# Altium PCB PCB1.PcbDoc (part 3 of 5)
Units mm, origin at the board's own origin, x right, y up, seen from the top; angles counter-clockwise.
Board outline 130 x 90 mm, 4 copper layers (Top Layer, Int 1 (GND), Int 2 (PWR), Bottom Layer), stack 1.466 mm thick; 419 components, 281 nets, 1355 pads, 522 vias.
Unrouted connection lines stored in the file: 26.
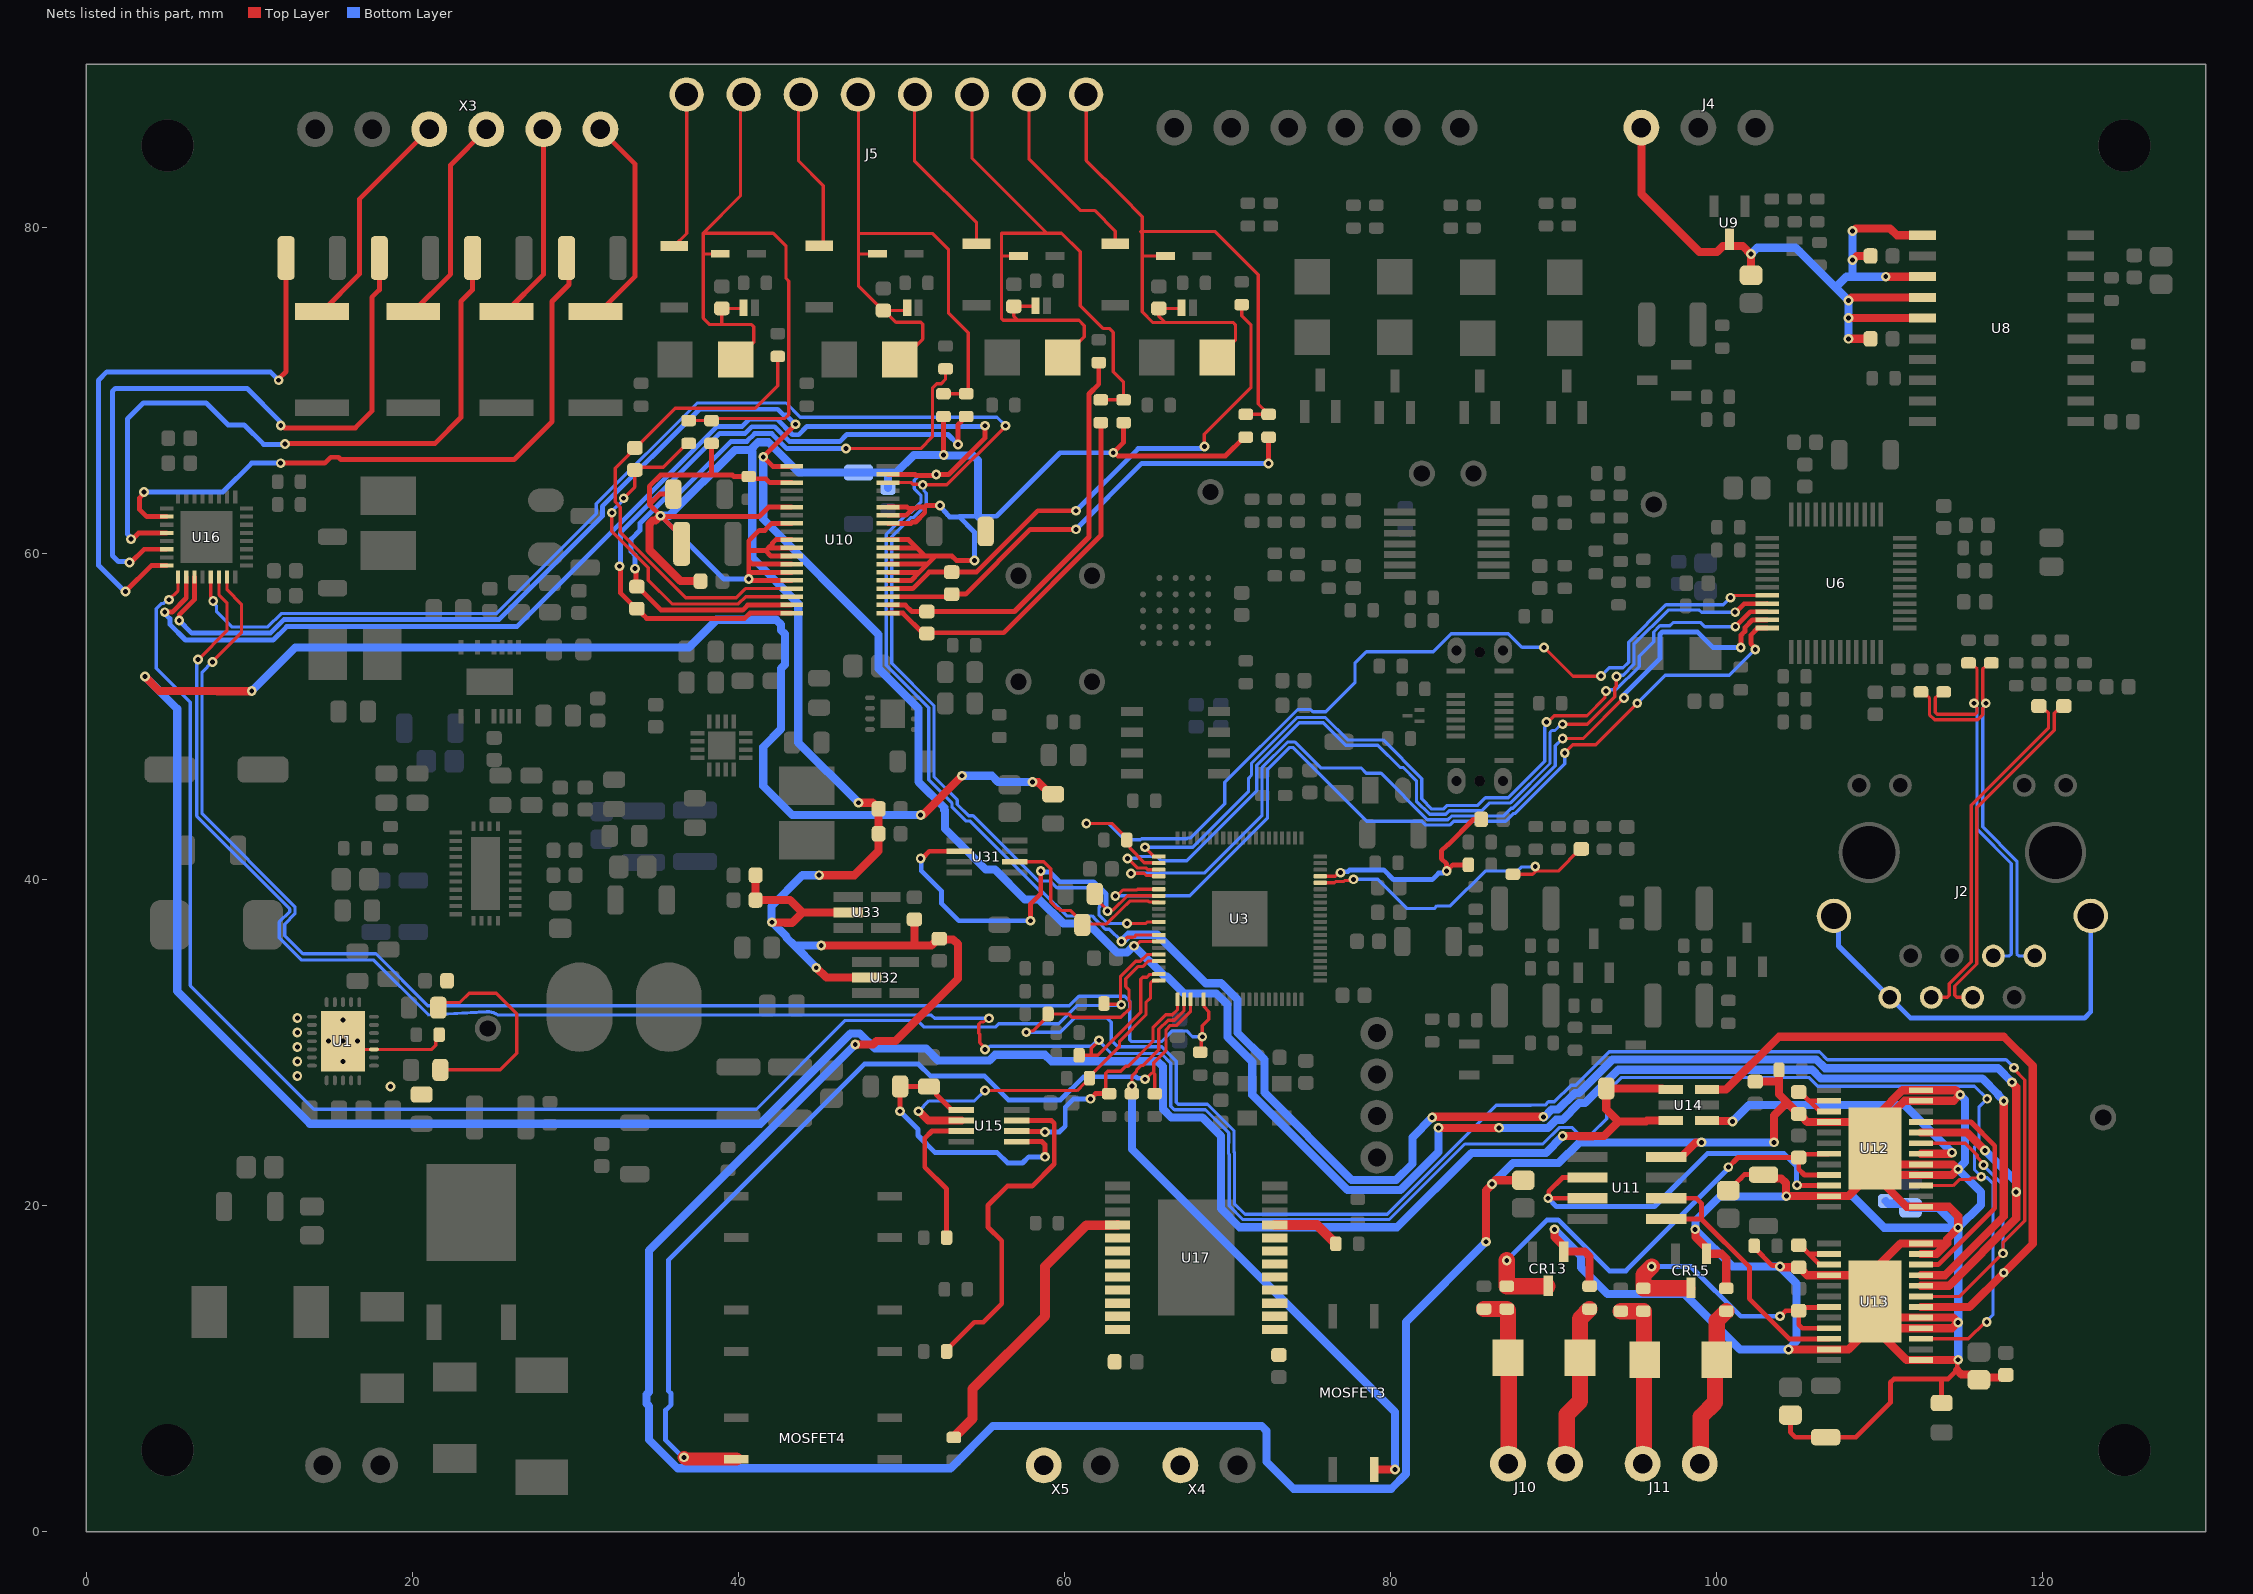
[diagram p5: the nets of this part, all layers, seen from the top]

## Via types
v1: diameter 0.6, hole 0.3, Top Layer to Bottom Layer, tented both sides, 508 vias
v2: diameter 0.6, hole 0.3, Top Layer to Bottom Layer, 14 vias

## Nets (pads, with @x,y where several pads share a name; then routed paths per layer and width w, separated by ;. In a path a pad name is that pad's centre, name@x,y a point inside that pad or via, vN(x,y) a via of type N, cw(c..) or ccw(c..) an arc to the next point about the centre after c; other vN are vias at no path point) (continued)
AGND: C60.1 C61.1 C62.1 C63.2 C64.1 C65.1 C66.1 C67.1 C76.1 C77.1 C78.1 C79.1 C80.2 C81.2 C83.2 C84.2 C86.1 C87.1 C88.1 C89.2 C123.1 C124.1 C125.2 C126.2 CR13.1 CR15.1 R62.1 R80.1 R81.1 R82.1 R83.1 R85.1 R87.2 R88.2 R89.1 R179.2 U10.3 U10.6 U10.8 U10.10 U10.11 U10.12 U10.13 U10.14 U10.15 U10.24 U10.25 U10.26 U10.27 U10.28 U10.29 U10.31 U10.32 U10.33 U11.4 U12.1 U12.4 U12.5 U12.11 U12.12 U12.16 U12.23 U12.25 U13.1 U13.4 U13.5 U13.11 U13.12 U13.16 U13.23 U13.25 U32.2 U33.2 | length 518.9
  Top Layer w0.3: C61.1@36.017,63.627 35.179,63.627 34.544,62.992 ; C63.2@36.488,61.048 v1@35.306,62.23 ; R80.1@38.354,66.737 38.354,64.929 38.227,64.802 ; U10.15@43.278,58.333 40.808,58.333 40.721,58.42 v1(40.64,58.42) 40.64,58.928 ; U10.14@43.278,58.833 40.735,58.833 40.64,58.928 ; U10.13@43.278,59.333 40.851,59.333 40.64,59.544 ; U10.12@43.278,59.833 41.996,59.833 41.669,60.16 ; U10.11@43.278,60.333 41.931,60.333 41.887,60.377 ; U10.10@43.278,60.833 42.291,60.833 42.104,60.646 42.104,60.595 41.887,60.377 ; U10.8@43.278,61.833 42.055,61.833 41.63,61.408 41.291,61.408 40.64,60.757 40.64,60.16 ; U10.6@43.278,62.833 41.852,62.833 41.277,62.258 35.334,62.258 v1@35.306,62.23 ; U10.3@43.278,64.333 41.927,64.333 41.69,64.57 40.778,64.57 R62.1@40.64,64.708 39.728,64.708 39.634,64.802 38.227,64.802 ; U10.24@49.178,58.333 50.592,58.333 51.093,58.833 ; U10.25@49.178,58.833 51.093,58.833 ; U10.26@49.178,59.333 51.592,59.333 ; U10.27@49.178,59.833 51.435,59.833 ; U10.28@49.178,60.333 50.935,60.333 ; U10.29@49.178,60.833 50.435,60.833 50.935,60.333 ; U10.31@49.178,61.833 50.606,61.833 50.689,61.916 50.867,61.916 51.435,62.484 51.435,62.833 ; U10.32@49.178,62.333 50.3,62.333 50.725,62.758 ; U10.33@49.178,62.833 50.36,62.833 50.435,62.758 50.725,62.758 ; v1(52.373,62.934) 51.536,62.934 51.435,62.833 ; R81.1@52.578,68.388 52.578,66.04 52.591,66.027 v1(52.591,66.023) ; v1(54.483,59.563) 53.366,59.563 53.096,59.833 52.061,59.833 ; R82.1@63.627,68.007 63.627,66.802 v1(62.992,66.167) 63.073,66.167 63.267,65.973 69.875,65.973 71.02,67.118 R83.1@71.12,67.118 ; C81.2@100.711,20.916 100.73,20.916 101.478,21.664 101.478,21.683 101.69,21.895 C84.2@102.87,21.895 ; R88.2@102.297,17.526 102.297,17.426 103.41,16.313 103.829,16.313 v1(103.886,16.256) ; C80.2@104.521,7.151 104.521,6.096 104.826,5.791 C83.2@106.68,5.791 108.534,5.791 110.65,7.907 110.65,9.145 110.855,9.35 113.792,9.35 ; R179.2@113.792,7.885 113.792,9.35 ; v1(114.808,10.541) 114.801,10.534 114.751,10.484 114.751,9.897 114.632,9.779 114.602,9.779 114.173,9.35 113.792,9.35 ; 34.544,62.992 v1(35.234,62.302) v1@35.306,62.23 ; 34.544,62.992 34.544,64.113 35.233,64.802 38.227,64.802 ; 40.64,58.928 40.64,59.544 ; 40.64,59.544 40.64,60.16 ; 40.64,60.16 41.669,60.16 ; 41.669,60.16 41.887,60.377 ; 50.725,62.758 50.911,62.758 50.986,62.833 51.435,62.833 ; 50.935,60.333 51.435,59.833 ; 51.093,58.833 51.592,59.333 ; 51.435,59.833 52.061,59.833 ; 51.592,59.333 52.077,59.817 52.061,59.833
  Top Layer w0.5: v1(35.234,62.302) 35.207,62.302 34.911,62.006 34.752,62.006 34.544,61.798 34.544,60.198 36.449,58.293 C62.1@37.679,58.293 ; C123.1@41.061,40.259 C124.1@41.061,38.735 43.162,38.735 43.924,37.973 ; v1(42.065,37.374) 42.084,37.355 42.858,37.355 42.875,37.338 43.289,37.338 43.924,37.973 ; v1(44.776,34.579) 44.803,34.579 45.408,33.975 U32.2@47.864,33.975 ; v1(44.958,40.259) 47.117,40.259 48.601,41.743 C64.1@48.601,42.799 C67.1@48.601,44.323 48.601,44.373 48.426,44.548 48.376,44.548 48.22,44.704 v1(47.371,44.704) ; v1(45.085,35.941) 50.8,35.941 ; U33.2@46.729,37.973 43.924,37.973 ; v1(47.167,29.876) 48.254,29.876 48.467,30.089 49.647,30.089 53.467,33.909 53.467,36.029 53.174,36.322 C125.2@52.364,36.322 ; C126.2@50.8,37.552 50.8,35.941 ; C125.2@52.324,36.362 52.274,36.362 51.853,35.941 50.8,35.941 ; v1(85.852,17.78) 85.852,20.928 86.213,21.289 v1(86.213,21.316) 86.448,21.551 C89.2@88.138,21.551 ; v1(90.043,18.542) 90.055,18.53 90.055,18.075 90.581,17.55 90.581,17.204 CR13.1@90.614,17.17 91.909,17.17 92.202,16.877 R85.1@92.202,15.051 ; U11.4@96.902,22.987 97.825,22.987 98.714,23.876 v1(99.06,23.876) ; v1(98.679,18.542) 98.698,18.523 98.698,18.068 99.377,17.389 CR15.1@99.377,17.043 100.291,17.043 100.584,16.75 R89.1@100.584,14.924 ; C88.1@102.362,27.599 103.794,27.599 103.821,27.572 ; C84.2@102.87,21.895 103.099,21.666 103.955,21.666 104.248,21.373 104.248,20.593 v1(104.267,20.574) U12.23@106.883,20.574 108.077,20.574 U12.25@109.093,21.59 ; v1(103.505,23.876) 103.505,25.514 104.258,26.267 104.376,26.267 ; R87.2@103.821,28.321 103.821,27.572 ; v1(103.886,16.256) 103.913,16.256 103.953,16.216 C87.1@105.029,16.216 ; v1(104.394,11.176) U13.23@106.883,11.176 108.077,11.176 U13.25@108.966,12.065 ; C86.1@105.029,25.614 104.979,25.614 104.804,25.789 104.804,25.839 104.376,26.267 ; C87.1@105.079,16.216 105.254,16.041 105.254,16.019 105.547,15.726 U13.16@106.883,15.726 U13.25@108.839,15.726 ; C86.1@105.079,25.614 105.254,25.439 105.254,25.417 105.547,25.124 U12.16@106.883,25.124 U12.25@108.458,25.124 ; U13.25@109.855,16.256 111.275,17.676 U13.12@112.522,17.676 114.14,17.676 ; U12.25@109.982,25.654 111.402,27.074 U12.12@112.522,27.074 114.631,27.074 v1@114.908,26.797 ; U13.25@110.236,11.938 111.641,10.534 v1@114.801,10.534 ; U12.25@110.236,21.336 111.648,19.924 U12.1@112.522,19.924 114.252,19.924 114.808,19.368 114.808,18.615 114.14,17.947 114.14,17.676 ; U13.25@110.744,13.126 U13.5@112.522,13.126 114.482,13.126 114.762,12.846 v1@114.762,12.827 ; U12.25@110.744,25.654 111.514,26.424 U12.11@112.522,26.424 114.535,26.424 v1@114.908,26.797 ; U13.25@110.871,12.476 U13.4@112.522,12.476 114.43,12.476 114.781,12.827 v1(114.808,12.827) ; U12.25@110.871,22.524 U12.5@112.522,22.524 114.482,22.524 v1@114.781,22.225 ; U12.25@110.998,21.874 U12.4@112.522,21.874 114.43,21.874 v1@114.781,22.225 ; U13.11@112.522,17.026 113.49,17.026 114.14,17.676 ; 114.751,9.897 115.019,9.629 115.759,9.629 C77.1@116.078,9.31 116.229,9.461 117.578,9.461 C79.1@117.729,9.612 ; v1(114.808,22.225) v1@114.781,22.225 ; v1(114.935,26.797) v1@114.908,26.797 ; 103.821,27.572 103.821,26.822 104.376,26.267
  Bottom Layer w0.3: v1(35.234,62.302) 39.116,58.42 v1(40.64,58.42) ; v1(52.373,62.934) 52.373,62.852 52.783,62.442 52.783,62.406 52.959,62.23 53.548,62.23 54.483,61.295 v1(54.483,59.563) ; 53.548,62.271 54.689,62.271 55.829,62.271 59.725,66.167 v1(62.992,66.167)
  Bottom Layer w0.5: v1(35.234,62.302) 35.759,62.302 39.791,66.334 40.741,66.334 ; v1@42.037,37.374 42.037,38.354 43.942,40.259 v1(44.958,40.259) ; v1(42.065,37.374) 42.952,36.487 42.952,36.423 43.434,35.941 ; v1(44.776,34.579) 44.776,34.599 43.434,35.941 ; v1(45.085,35.941) 43.434,35.941 ; v1(47.167,29.876) 34.527,17.236 34.527,8.558 34.377,8.408 34.377,7.848 34.531,7.694 34.531,5.638 36.285,3.884 53.01,3.884 55.603,6.477 72.097,6.477 72.39,6.184 72.39,4.287 74.043,2.634 80.043,2.634 80.939,3.53 80.939,12.867 v1(85.852,17.78) ; v1(47.371,44.704) 43.671,48.404 43.671,56.913 40.854,59.73 40.854,66.221 40.741,66.334 ; C66.1@49.178,64.008 49.178,64.919 49.149,64.948 ; 54.689,62.271 54.689,65.707 54.396,66 52.614,66 v1(52.591,66.023) 50.762,66.023 49.686,64.948 49.149,64.948 ; v1(86.213,21.316) 87.503,22.606 90.308,22.606 91.578,23.876 v1(99.06,23.876) v1(103.505,23.876) ; v1(90.043,18.542) 91.687,16.898 91.687,16.196 93.312,14.572 98.028,14.572 101.423,11.176 v1(104.394,11.176) 104.902,11.684 104.902,15.213 103.886,16.229 v1(103.886,16.256) 100.965,16.256 v1(98.679,18.542) 98.698,18.561 98.698,19.069 100.184,20.555 104.248,20.555 v1(104.267,20.574) 108.327,20.574 110.259,18.642 v1(114.808,18.642) ; C78.1@110.363,20.28 110.538,20.105 111.633,20.105 C76.1@111.887,19.851 113.599,19.851 v1(114.808,18.642) ; v1(114.808,10.541) v1(114.808,12.827) v1(114.808,18.642) ; v1@114.808,22.198 114.808,22.252 115.216,22.66 115.216,26.489 114.935,26.77 v1(114.935,26.797) ; v1(114.808,22.225) 116.205,20.828 116.205,20.039 v1(114.808,18.642) ; 40.741,66.334 41.218,66.81 41.84,66.81 43.703,64.948 C65.1@47.371,64.948 49.149,64.948
AI0_IN: F3.2 J5.1 | length 10.1
  Top Layer w0.2: F3.2@35.533,78.848 F3.2@36.068,78.848 36.83,79.61 J5.1@36.83,88.138
AI0_RET: C72.1 CR4.2 CR8.2 J5.2 J6.2 R72.1 R80.2 | length 46
  Top Layer w0.2: R72.1@36.957,68.137 R80.2@38.354,68.137 38.481,68.264 42.849,68.264 43.093,68.508 43.093,76.684 42.926,76.851 42.926,78.832 42.129,79.629 37.846,79.629 ; CR8.2@38.887,78.359 37.846,78.359 ; CR4.2@39.83,71.882 39.891,71.882 40.941,72.932 40.941,73.893 40.809,74.025 38.989,74.025 ; J6.2@40.321,75.057 40.281,75.017 C72.1@38.989,75.017 38.989,74.025 ; J5.2@40.33,88.138 40.132,87.94 40.132,81.915 37.846,79.629 ; 37.846,78.359 37.846,79.629 ; 37.846,78.359 37.846,74.422 38.243,74.025 38.989,74.025
AI1_IN: F4.2 J5.3 | length 10.1
  Top Layer w0.2: J5.3@43.83,88.138 43.688,87.996 43.688,84.074 45.212,82.55 45.212,78.975 F4.2@45.495,78.975
AI1_RET: C73.1 CR5.2 CR9.2 J5.4 J7.2 R74.1 R81.2 | length 50.2
  Top Layer w0.2: J5.4@47.33,88.138 47.371,88.097 47.371,79.55 ; CR9.2@48.539,78.359 47.371,78.359 ; CR5.2@49.99,71.882 50.051,71.882 51.308,73.139 51.308,74.041 51.181,74.168 49.667,74.168 C73.1@48.945,74.89 ; J7.2@50.29,75.12 J7.2@50.354,75.057 50.354,75.04 50.204,74.89 C73.1@48.945,74.89 ; R81.2@52.578,69.788 R74.1@53.975,69.788 R74.1@54.102,69.788 ; 47.371,78.359 47.371,76.364 48.845,74.89 C73.1@48.895,74.89 C73.1@48.945,74.89 ; 47.371,78.359 47.371,79.55 ; 47.371,79.55 47.43,79.609 51.928,79.609 52.885,78.652 52.885,74.75 54.102,73.533 ; R74.1@54.102,69.788 54.102,73.533 ; R74.1@54.102,69.788 54.102,73.533 ; R74.1@54.102,69.788 54.102,73.533 ; R74.1@54.102,69.788 54.102,73.533
AI2_IN: F5.2 J5.5 | length 11.8
  Top Layer w0.2: J5.5@50.83,88.138 50.8,88.108 50.8,84.074 54.61,80.264 F5.2@54.61,79.102 ; F5.2@54.575,79.136 F5.2@54.61,79.102 ; F5.2@54.61,78.975 F5.2@54.61,79.102 ; F5.2@54.61,79.102 F5.2@54.737,78.975 ; F5.2@54.61,79.102 F5.2@54.737,78.975 ; F5.2@54.61,79.102 F5.2@54.737,78.975 ; F5.2@54.61,79.102 F5.2@54.673,79.038 ; F5.2@54.61,79.102 F5.2@54.737,78.975 ; F5.2@54.61,79.102 F5.2@54.673,79.038 ; F5.2@54.673,79.038 F5.2@54.737,78.975
AI2_RET: C74.1 CR6.2 CR10.2 J5.6 J8.2 R76.1 R82.2 | length 43.9
  Top Layer w0.2: J5.6@54.33,88.138 54.33,84.227 58.928,79.629 ; CR10.2@57.175,78.232 56.134,78.232 ; J8.2@58.228,75.184 58.188,75.144 C74.1@56.896,75.144 56.896,74.549 57.15,74.295 ; CR6.2@59.896,72.009 59.957,72.009 60.95,73.001 61.214,73.266 61.214,73.962 60.892,74.284 57.161,74.284 57.15,74.295 ; R76.1@62.23,69.407 R82.2@63.627,69.407 63.627,70.485 62.992,71.12 62.992,73.543 62.748,73.787 62.357,73.787 60.96,75.184 60.96,78.486 59.817,79.629 58.928,79.629 ; 56.134,78.232 56.134,79.629 58.928,79.629 ; 56.134,78.232 56.134,74.412 56.251,74.295 57.15,74.295
AI3_IN: F6.2 J5.7 | length 11.9
  Top Layer w0.2: J5.7@57.83,88.138 57.83,84.156 60.96,81.026 61.849,81.026 63.119,79.756 F6.2@63.119,78.975
AI3_RET: C75.1 CR7.2 CR11.2 J5.8 J9.2 R78.1 R83.2 | length 45.7
  Top Layer w0.2: J5.8@61.33,88.138 61.33,84.085 63.5,81.915 64.77,80.645 64.77,79.728 ; CR11.2@66.192,78.232 64.77,78.232 ; J9.2@67.183,75.057 67.143,75.017 C75.1@65.786,75.017 65.786,74.549 66.183,74.152 ; CR7.2@69.373,72.009 69.434,72.009 70.484,73.059 70.484,74.02 70.352,74.152 66.183,74.152 ; R83.2@70.993,68.518 R78.1@72.39,68.518 ; R78.1@72.517,68.518 72.453,68.582 71.882,69.153 71.882,77.089 69.243,79.728 64.77,79.728 ; 64.77,78.232 64.77,79.629 64.671,79.728 64.77,79.728 ; 64.77,78.232 64.77,74.803 65.421,74.152 66.183,74.152
AIN_0GND: C68.1 R72.2 U10.17 | length 21.8
  Top Layer w0.2: v1(32.241,62.484) 32.241,61.358 34.482,59.117 34.482,58.346 35.932,56.896 40.005,56.896 40.442,57.333 U10.17@43.278,57.333 ; v1(32.969,63.373) 33.655,64.059 C68.1@33.655,65.111 33.822,65.278 35.398,65.278 36.857,66.737 R72.2@36.957,66.737
  Bottom Layer w0.2: v1(32.241,62.484) 32.241,62.565 32.969,63.292 v1(32.969,63.373)
AIN_0P: C68.2 R73.2 U10.16 | length 30.4
  Top Layer w0.2: R73.2@42.418,72.071 42.418,70.279 41.029,68.89 36.124,68.89 C68.2@33.676,66.442 ; U10.16@43.278,57.833 40.434,57.833 39.878,57.277 36.782,57.277 32.766,61.293 32.766,62.834 32.444,63.156 32.444,65.21 33.28,66.046 33.28,66.075 C68.2@33.646,66.442 ; C68.2@33.646,66.442 C68.2@33.676,66.442 ; C68.2@33.646,66.442 C68.2@33.676,66.442 ; C68.2@33.646,66.442 C68.2@33.676,66.442 ; C68.2@33.646,66.442 C68.2@33.676,66.442
AIN_1GND: C69.1 R74.2 U10.19 | length 41.2
  Top Layer w0.3: v1(32.715,59.206) 32.766,59.155 32.766,57.568 33.732,56.602 33.798,56.602 34.107,56.293 34.107,56.277 34.377,56.007 40.386,56.007 40.712,56.333 U10.19@43.278,56.333 ; v1(53.467,66.675) 53.467,67.88 53.69,68.103 53.69,68.19 53.889,68.388 R74.2@53.975,68.388
  Bottom Layer w0.3: v1(32.715,59.206) 32.766,59.257 32.766,61.248 38.872,67.354 40.418,67.354 40.824,67.76 42.234,67.76 43.148,66.846 46.221,66.846 46.659,67.284 52.858,67.284 v1(53.467,66.675)
AIN_1P: C69.2 R75.2 U10.18 | length 40
  Top Layer w0.2: v1(46.609,66.421) 51.181,66.421 51.903,67.143 51.903,70.129 52.168,70.394 52.44,70.394 52.705,70.659 R75.2@52.705,71.309
  Top Layer w0.3: v1(33.655,59.055) 33.712,58.998 33.712,58.022 C69.2@33.782,57.952 ; C69.2@33.832,57.952 35.269,56.515 40.259,56.515 40.567,56.823 43.268,56.823 U10.18@43.278,56.833
  Bottom Layer w0.3: v1(33.655,59.055) 33.655,59.887 33.429,60.113 33.429,60.864 33.969,61.404 33.969,61.85 35.686,63.567 36.262,63.567 39.554,66.859 40.524,66.859 41,67.335 42.058,67.335 42.972,66.421 v1(46.609,66.421)
AIN_2GND: C70.1 R76.2 U10.20 | length 23
  Top Layer w0.3: U10.20@49.178,56.333 50.093,56.333 51.348,55.078 C70.1@51.562,55.078 51.611,55.127 56.27,55.127 62.23,61.087 R76.2@62.23,68.007
AIN_2P: C70.2 R77.2 U10.21 | length 25.3
  Top Layer w0.3: U10.21@49.178,56.833 49.188,56.823 50.242,56.823 50.637,56.428 C70.2@51.562,56.428 56.936,56.428 61.505,60.997 61.505,69.768 62.103,70.366 R77.2@62.103,71.69
AIN_3GND: C71.1 R78.2 U10.22 | length 28.3
  Top Layer w0.3: U10.22@49.178,57.333 52.928,57.333 C71.1@53.086,57.491 53.935,57.491 57.912,61.468 v1(60.706,61.468) ; v1(72.517,65.51) R78.2@72.517,67.062
  Bottom Layer w0.3: v1(60.706,61.468) 64.748,65.51 v1(72.517,65.51)
AIN_3P: C71.2 R79.2 U10.23 | length 33.1
  Top Layer w0.2: v1(68.58,66.548) 68.58,67.31 71.445,70.175 71.445,73.978 70.866,74.557 R79.2@70.866,75.246
  Top Layer w0.3: U10.23@49.178,57.833 50.694,57.833 51.702,58.841 54.6,58.841 58.37,62.611 v1(60.706,62.611)
  Bottom Layer w0.3: v1(60.706,62.611) 64.516,66.421 68.453,66.421 v1(68.58,66.548)
ANA_5V_MON: C32.2 R_RP3.1 U3.57 | length 14.5
  Top Layer w0.2: U3.57@75.686,40.195 76.602,40.195 76.822,40.414 v1(76.93,40.414)
  Top Layer w0.3: R_RP3.1@84.771,40.894 83.82,40.894 v1(83.439,40.513) 83.439,40.953 83.118,41.274 83.118,41.75 83.472,42.104 83.498,42.104 85.082,43.688 C32.2@85.558,43.688
  Bottom Layer w0.3: v1(76.93,40.414) 76.987,40.472 77.377,40.472 77.486,40.58 79.581,40.58 80.177,39.984 82.546,39.984 82.948,40.386 83.231,40.386 83.358,40.513 v1(83.439,40.513)
AND1_OUT: R96.1 U15.7 | length 21
  Top Layer w0.3: R96.1@52.77,11.049 52.77,11.149 54.465,12.844 55.025,12.844 56.156,13.975 56.156,17.833 55.305,18.685 55.305,19.999 56.497,21.191 58.021,21.191 59.376,22.546 59.376,25.041 59.2,25.217 U15.7@57.067,25.217
AND2_OUT: R97.1 U15.3 | length 9.1
  Top Layer w0.3: R97.1@52.77,18.034 52.77,21.017 51.435,22.352 51.435,24.13 51.876,24.571 U15.3@53.673,24.571
AO0_CLEAR: U13.6 U14.6 | length 41.4
  Top Layer w0.5: U14.6@99.416,27.112 100.569,27.112 103.81,30.353 117.602,30.353 119.38,28.575 119.38,17.653 v1(117.602,15.875) 115.503,13.776 U13.6@112.522,13.776
AO0_OUT: CR14.1 J11.1 R90.1 R91.2 | length 52.6
  Top Layer w1: R90.1@94.107,13.524 R91.2@95.504,13.524 ; J11.1@95.504,4.445 J11.1@95.544,4.485 ; J11.1@95.544,4.485 CR14.1@95.544,10.541 ; J11.1@95.544,4.485 CR14.1@95.544,10.541 ; J11.1@95.544,4.485 CR14.1@95.544,10.541 ; J11.1@95.544,4.485 CR14.1@95.544,10.541 ; J11.1@95.544,4.485 CR14.1@95.544,10.541 ; J11.1@95.544,4.485 CR14.1@95.544,10.541 ; CR14.1@95.544,10.541 R91.2@95.544,13.501 ; CR14.1@95.544,10.541 R91.2@95.544,13.501 ; CR14.1@95.544,10.541 R91.2@95.544,13.501 ; CR14.1@95.544,10.541 R91.2@95.544,13.501 ; CR14.1@95.544,10.541 R91.2@95.544,13.501
AO0_RAW: C85.1 CR15.3 R91.1 U13.19 U13.21 | length 19.4
  Top Layer w0.3: v1(103.886,13.208) 104.227,13.549 C85.1@105.029,13.549 ; U13.21@106.883,12.476 105.253,12.476 105.029,12.7 C85.1@105.029,13.549 ; U13.19@106.883,13.776 106.856,13.749 105.229,13.749 C85.1@105.029,13.549
  Top Layer w1: v1(96.012,16.256) 95.504,15.748 R91.1@95.504,14.924 CR15.3@98.209,14.924
  Bottom Layer w0.3: v1(96.012,16.256) 98.425,16.256 101.473,13.208 v1(103.886,13.208)
AO0_REF_5V: C87.2 U13.14 U13.15 | length 3.6
  Top Layer w0.3: C87.2@105.029,17.566 105.265,17.33 105.376,17.33 106.33,16.376 U13.15@106.883,16.376 ; 105.653,17.026 U13.14@106.883,17.026
AO0_RET: CR14.2 J11.2 R89.2 | length 9.7
  Top Layer w1: J11.2@99.004,4.445 99.017,4.458 99.017,7.045 99.896,7.924 99.896,10.44 CR14.2@99.997,10.541 99.997,12.937 R89.2@100.584,13.524
AO0_SDO_TO_AO1: U12.9 U13.10 | length 14.9
  Top Layer w0.3: U13.10@112.522,16.376 113.582,16.376 117.047,19.841 117.047,23.669 115.592,25.124 U12.9@112.522,25.124
AO0_VSENSE: U11.1 U11.2 U13.22 | length 17.4
  Top Layer w0.3: U11.1@96.902,19.177 99.06,19.177 ; U11.2@96.902,20.447 98.755,20.447 99.06,20.142 99.06,19.177 ; U13.22@106.883,11.826 104.455,11.826 101.999,14.282 101.999,16.238 99.06,19.177
AO1_CLEAR: U12.6 U14.4 | length 18.6
  Top Layer w0.5: U14.4@99.434,25.194 99.445,25.183 100.901,25.183 100.938,25.146 v1(100.965,25.146) ; U12.6@112.522,23.174 114.333,23.174 114.4,23.241 v1(114.427,23.241)
  Bottom Layer w0.5: v1(100.965,25.146) 101.981,26.162 111.506,26.162 v1(114.427,23.241)
AO1_OUT: CR12.1 J10.1 R84.1 R86.2 | length 10.7
  Top Layer w1: R84.1@85.725,13.651 R86.2@87.122,13.651 87.201,13.572 CR12.1@87.201,10.668 87.253,10.616 87.253,4.497 J10.1@87.305,4.445
AO1_RAW: C82.1 CR13.3 R86.1 U12.19 U12.21 | length 32
  Top Layer w0.3: CR13.3@89.625,15.051 CR13.3@89.662,15.088 ; v1(100.711,22.352) 101.306,22.947 C82.1@105.029,22.947 ; U12.21@106.883,21.874 105.38,21.874 105.029,22.225 C82.1@105.029,22.947 ; U12.19@106.883,23.174 106.856,23.147 105.229,23.147 C82.1@105.029,22.947
  Top Layer w1: v1(87.122,16.637) R86.1@87.122,15.051 CR13.3@89.625,15.051
  Bottom Layer w0.3: v1(87.122,16.637) 89.602,19.117 90.281,19.117 93.409,15.989 94.428,15.989 100.711,22.272 v1(100.711,22.352)
AO1_REF_5V: C86.2 U12.14 U12.15 | length 3.6
  Top Layer w0.3: C86.2@105.029,26.964 105.113,26.964 105.653,26.424 U12.14@106.883,26.424 ; 105.666,26.437 106.33,25.774 U12.15@106.883,25.774
AO1_RET: CR12.2 J10.2 R85.2 | length 19.1
  Top Layer w1: R85.2@92.202,13.651 91.615,13.064 CR12.2@91.615,10.668 91.615,7.997 90.805,7.187 ; J10.2@90.805,4.17 90.805,7.187 ; J10.2@90.805,4.17 90.805,7.187 ; J10.2@90.805,4.17 90.805,7.187 ; J10.2@90.805,4.17 90.805,7.187
AO1_VSENSE: U11.6 U11.7 U12.22 | length 25.8
  Top Layer w0.3: U11.7@92.074,20.447 v1(89.662,20.447) 89.702,20.487 89.702,20.868 90.551,21.717 U11.6@92.074,21.717 ; v1(104.923,21.249) 104.935,21.237 106.871,21.237 U12.22@106.883,21.224
  Bottom Layer w0.3: v1(89.662,20.447) 90.17,19.939 96.186,19.939 99.428,23.181 104.124,23.181 104.894,22.411 104.894,21.278 v1(104.923,21.249)
AO_15V_MON: C31.2 R_RP2.1 U3.56 | length 20.2
  Top Layer w0.2: U3.56@75.686,39.795 76.552,39.795 76.627,39.87 77.128,39.87 77.187,39.928 77.647,39.928 v1(77.724,40.005) ; R_RP2.1@87.503,40.321 88.708,40.321 v1@88.9,40.513 ; v1(88.871,40.787) 88.9,40.758 v1@88.9,40.513 ; C31.2@91.694,41.87 91.644,41.87 90.287,40.513 v1@88.9,40.513
  Bottom Layer w0.2: v1(77.724,40.005) 79.221,40.005 81.016,38.21 82.68,38.21 82.841,38.371 83.656,38.371 85.798,40.513 87.769,40.513 88.014,40.758 88.842,40.758 v1(88.871,40.787)
AO_ENABLE_REQ: R175.1 U3.7 U31.2 | length 25.5
  Top Layer w0.2: R175.1@61.86,38.989 61.86,38.886 62.64,38.106 v1(62.64,38.051) ; v1@62.655,38.036 62.747,38.128 63,38.128 63.867,38.995 U3.7@65.786,38.995
  Top Layer w0.3: v1(51.181,41.275) 51.262,41.275 51.714,41.727 U31.2@53.55,41.727 ; v1(57.912,37.465) 57.912,38.481 58.547,39.116 v1(58.547,40.513)
  Bottom Layer w0.3: v1(51.181,41.275) 51.22,41.236 51.22,40.525 52.451,39.294 52.451,38.53 53.516,37.465 v1(57.912,37.465) ; v1(58.547,40.513) 58.604,40.456 59.095,40.456 59.694,39.857 61.797,39.857 62.544,39.11 62.544,38.229 62.64,38.132 v1(62.64,38.051)
AO_LATCH: R16.1 U3.17 U12.7 U13.7 | length 115.6
  Top Layer w0.2: v1(57.658,30.624) 57.735,30.701 58.044,30.701 58.993,31.65 R16.1@58.993,31.75 60.253,31.75 60.459,31.544 63.459,31.544 64.025,32.11 64.025,32.481 63.955,32.551 63.955,32.986 ; 63.954,32.987 63.954,33.228 63.754,33.428 63.754,33.901 64.505,34.652 64.792,34.652 65.136,34.995 U3.17@65.786,34.995 ; U13.7@112.522,14.426 114.912,14.426 v1(117.553,17.067) 117.553,17.72 118.889,19.056 118.889,27.697 118.237,28.349 v1(118.237,28.448) ; U12.7@112.522,23.824 115.241,23.824 115.976,23.089 115.976,22.947 116.356,22.568 v1(116.356,22.478)
  Bottom Layer w0.2: v1(57.658,30.624) 59.733,30.624 60.622,31.513 62.589,31.513 62.865,31.237 62.865,30.128 63.263,29.73 65.964,29.73 66.047,29.647 66.063,29.647 66.85,28.86 66.85,28.105 66.852,28.102 66.852,26.33 66.97,26.212 68.772,26.212 70.396,24.588 70.396,23.697 70.391,23.692 70.391,23.298 70.423,23.266 70.423,20.116 71.07,19.469 79.794,19.469 86.479,26.154 88.614,26.154 88.622,26.162 89.486,26.162 89.681,26.357 90.048,26.357 91.074,27.383 91.354,27.383 93.402,29.431 106.302,29.431 106.792,28.941 117.744,28.941 v1(118.237,28.448) ; v1(116.356,22.478) 117.553,21.281 v1(117.553,17.067)
AO_SAFE_EN: R180.2 R182.1 U14.1 U14.3 | length 207.6
  Top Layer w0.5: v1(3.609,52.443) 4.49,51.562 8.018,51.562 8.046,51.534 9.226,51.534 9.235,51.543 10.141,51.543 v1(10.16,51.562) ; v1(51.181,43.942) 51.2,43.961 51.327,43.961 v1(53.721,46.355) ; v1(58.039,45.974) 58.058,45.955 58.402,45.955 59.134,45.223 R180.2@59.309,45.223 ; v1(90.551,24.257) 91.536,24.257 91.545,24.247 92.382,24.247 92.392,24.257 93.079,24.257 93.974,25.152 ; U14.3@97.18,25.212 95.728,25.212 95.668,25.152 93.974,25.152 ; U14.1@97.18,27.112 96.723,27.112 96.657,27.178 R182.1@93.229,27.178 93.229,25.897 93.974,25.152
  Bottom Layer w0.5: v1(3.609,52.443) 5.588,50.464 5.588,33.15 13.719,25.019 41.356,25.019 46.888,30.551 47.447,30.551 48.374,29.624 51.523,29.624 52.248,28.899 55.398,28.899 55.742,29.243 58.799,29.243 59.195,28.847 65.716,28.847 66.04,28.523 66.04,25.908 66.548,25.4 68.453,25.4 69.596,24.257 69.596,24.028 69.591,24.023 69.591,22.967 69.596,22.962 69.596,19.812 70.739,18.669 80.391,18.669 84.953,23.231 89.525,23.231 v1(90.551,24.257) ; v1(10.16,51.562) 12.827,54.229 36.976,54.229 38.667,55.92 42.325,55.92 42.618,55.627 42.618,55.28 42.858,55.039 42.858,53.168 42.618,52.927 42.618,49.218 41.529,48.129 41.529,45.72 43.307,43.942 v1(51.181,43.942) ; v1(53.721,46.355) 55.549,46.355 55.93,45.974 v1(58.039,45.974)
BOARD_FAULT_N: R17.1 U3.19 U12.3 U13.3 U16.14 | length 182.1
  Top Layer w0.2: v1(6.858,53.478) 6.869,53.478 8.636,55.245 8.636,56.973 8.144,57.465 U16.14@8.144,58.547 ; v1(55.118,29.574) 55.118,29.682 54.804,29.996 54.804,30.25 54.802,30.252 54.802,30.502 54.737,30.567 54.737,31.115 54.878,31.256 55.041,31.256 55.264,31.479 v1(55.372,31.479) ; R17.1@60.955,29.21 61.542,29.21 ; v1(62.117,30.133) 62.117,30.113 61.644,29.64 61.644,29.312 61.542,29.21 ; U3.19@65.786,34.195 65.761,34.17 65.23,34.17 65.062,34.002 64.792,34.002 64.675,33.885 64.675,31.841 62.044,29.21 61.542,29.21 ; U13.3@112.522,11.826 115.438,11.826 116.465,12.853 v1(116.56,12.853) ; U12.3@112.522,21.224 114.496,21.224 114.862,21.59 115.522,21.59 115.622,21.69 116.146,21.69 v1(116.222,21.766)
  Bottom Layer w0.2: v1(6.858,53.478) 6.787,53.407 6.787,43.886 12.485,38.188 12.485,38.023 11.852,37.39 11.852,36.417 13.217,35.052 17.653,35.052 20.967,31.738 21.026,31.679 24.579,31.884 cw(c24.638,30.861) 25.256,31.679 51.834,31.679 52.034,31.479 v1(55.372,31.479) ; v1(55.118,29.574) 55.226,29.574 55.426,29.774 61.65,29.774 62.009,30.133 v1(62.117,30.133) ; v1@62.103,30.099 62.88,29.322 65.928,29.322 66.525,28.725 66.525,26.095 66.745,25.875 68.65,25.875 69.793,24.732 70.071,24.454 70.071,23.831 70.066,23.826 70.066,23.164 70.098,23.132 70.098,19.982 70.936,19.144 79.929,19.144 84.558,23.773 89.325,23.773 90.334,24.782 91.134,24.782 91.519,24.397 92.32,24.397 93.248,25.326 93.248,26.928 94.177,27.856 105.649,27.856 106.183,27.322 115.807,27.322 v1(116.586,26.543) 116.078,26.035 116.078,23.876 115.807,23.605 115.807,22.181 v1(116.222,21.766) 116.288,21.699 116.604,21.699 116.938,21.365 116.938,13.287 116.56,12.91 v1(116.56,12.853)
BOARD_SPI_MISO: U3.11 U10.36 U16.13 | length 104.9
  Top Layer w0.2: U16.13@7.644,58.547 7.644,57.331 7.795,57.18 v1(7.795,57.072) ; U10.36@49.178,64.333 50.608,64.333 50.708,64.233 51.273,64.233 v1(51.308,64.198) 52.791,64.198 56.388,67.796 v1(56.388,67.818) ; v1(63.828,37.295) 64.996,37.295 65.096,37.395 U3.11@65.786,37.395
  Bottom Layer w0.2: v1(7.795,57.072) 7.795,56.964 8.001,56.757 8.001,56.421 8.94,55.482 11.146,55.482 11.968,56.304 25.158,56.304 31.291,62.437 31.291,63.038 37.467,69.215 42.926,69.215 43.798,68.343 55.863,68.343 v1(56.388,67.818) ; v1(51.308,64.198) 51.385,64.122 51.385,63.824 51.523,63.685 51.523,62.981 50.733,62.191 50.575,62.191 49.403,61.019 49.403,53.254 51.999,50.658 51.999,46.299 53.425,44.873 53.425,44.594 54.119,43.9 54.398,43.9 58.391,39.907 59.114,39.907 59.539,39.482 61.641,39.482 62.169,38.954 62.169,38.323 62.115,38.269 62.115,37.834 62.654,37.295 v1(63.828,37.295)
BOARD_SPI_MOSI: U3.14 U10.1 U13.9 U16.11 | length 176.7
  Top Layer w0.2: v1(64.264,35.927) 64.373,35.927 64.641,36.195 U3.14@65.786,36.195
  Top Layer w0.3: v1(5.715,55.88) 5.715,56.229 6.644,57.158 U16.11@6.644,58.547 ; U10.1@43.278,65.333 42.109,65.333 v1(41.529,65.913) 43.498,67.882 v1(43.498,67.91)
  Top Layer w0.5: v1(82.931,24.765) v1(86.646,24.765) ; U13.9@112.522,15.726 114.003,15.726 117.602,19.325 v1(117.602,26.416)
  Bottom Layer w0.3: v1(5.715,55.88) 6.488,55.107 11.301,55.107 12.123,55.929 25.313,55.929 31.666,62.282 31.666,62.883 37.617,68.834 42.418,68.834 42.784,68.468 42.94,68.468 v1(43.498,67.91)
  Bottom Layer w0.5: v1(41.529,65.913) 41.529,62.102 48.603,55.028 48.603,52.923 51.054,50.472 51.054,45.986 52.625,44.415 52.625,44.263 52.665,44.223 52.665,43.107 55.172,40.601 55.731,40.601 57.567,38.765 58.45,38.765 59.93,37.286 61.455,37.286 63.22,35.52 63.831,35.52 64.237,35.927 v1(64.264,35.927) 66.155,34.036 66.294,34.036 67.32,33.01 69.308,33.01 69.99,32.328 69.99,30.34 71.519,28.811 71.519,26.779 77.349,20.949 80.602,20.949 82.931,23.278 v1(82.931,24.765) ; v1(86.646,24.765) 89.645,24.765 90.137,25.257 90.535,25.257 91.561,26.283 91.932,26.283 93.98,28.331 105.846,28.331 106.38,27.797 116.287,27.797 117.261,26.823 117.261,26.784 117.602,26.443 v1(117.602,26.416)
BOARD_SPI_SCK: U3.13 U10.37 U12.8 U13.8 U16.10 | length 200.4
  Top Layer w0.2: v1(63.5,36.195) 63.608,36.195 63.858,36.445 64.181,36.445 64.202,36.466 64.268,36.466 64.397,36.595 U3.13@65.786,36.595
  Top Layer w0.3: v1(4.826,56.388) 5.273,56.388 6.144,57.259 U16.10@6.144,58.547 ; U10.37@49.178,64.833 50.836,64.833 50.895,64.773 52.085,64.773 v1(52.14,64.827) 52.89,64.828 55.118,67.056 v1(55.118,67.818)
  Top Layer w0.5: v1(82.55,25.4) 82.59,25.44 v1(89.365,25.44) ; U13.8@112.522,15.076 114.237,15.076 118.364,19.203 v1(118.364,20.828) 118.364,27.278 118.11,27.532 v1(118.11,27.559) ; U12.8@112.522,24.474 115.353,24.474 v1(116.459,23.368)
  Bottom Layer w0.2: v1(52.14,64.827) 52.135,64.823 51.114,64.823 50.783,64.492 50.783,63.965 51.198,63.55 51.198,63.116 50.598,62.516 50.44,62.516 49.078,61.154 49.078,53.12 51.529,50.669 51.674,50.524 51.674,46.116 53.1,44.69 53.1,44.46 53.985,43.575 54.215,43.575 58.55,39.24 58.647,39.24 60.127,37.761 61.695,37.761 61.813,37.643 61.813,37.609 62.12,37.302 62.159,37.302 62.511,36.95 62.745,36.95 v1(63.5,36.195)
  Bottom Layer w0.3: v1(4.826,56.388) 4.826,56.307 5.14,55.993 5.14,55.642 6.1,54.682 11.477,54.682 12.299,55.504 26.421,55.504 38.696,67.779 40.242,67.779 40.68,68.217 42.378,68.217 43.324,67.271 43.7,67.271 44.208,67.779 v1@55.118,67.779
  Bottom Layer w0.5: v1(63.5,36.195) 63.527,36.195 63.934,36.602 65.694,36.602 68.66,33.635 69.606,33.635 70.615,32.626 70.615,30.599 72.263,28.951 72.263,26.924 77.613,21.574 80.343,21.574 81.334,22.565 81.334,24.184 v1(82.55,25.4) ; v1@89.395,25.399 89.878,25.882 90.276,25.882 91.302,26.908 91.551,26.908 93.599,28.956 106.105,28.956 106.639,28.422 117.247,28.422 v1(118.11,27.559) ; v1(116.459,23.368) 118.345,21.482 118.345,20.847 v1(118.364,20.828)
CHASSIS_ETH: J2.8 J2.14 J2.16 | length 25.3
  Bottom Layer w0.3: J2.14@107.187,37.766 107.466,37.487 107.466,35.917 J2.8@110.617,32.766 111.887,31.496 122.555,31.496 122.937,31.878 J2.16@122.937,37.766
DI0_IN: R98.1 X3.1 | length 13
  Top Layer w0.3: R98.1@31.496,74.803 33.655,76.962 33.655,83.888 X3.1@31.543,86
DI0_LED: D3.1 U16.2 | length 40.5
  Top Layer w0.3: v1(3.556,63.754) 3.556,63.673 3.286,63.403 3.286,62.678 3.718,62.246 U16.2@4.945,62.246 ; v1(11.933,65.525) 14.635,65.525 15.002,65.892 15.478,65.892 15.628,65.742 26.245,65.742 28.575,68.072 28.575,75.438 29.618,76.481 29.618,77.898 29.644,77.925 D3.1@29.464,78.105
  Bottom Layer w0.3: v1(3.556,63.754) 3.562,63.76 8.388,63.76 10.153,65.525 v1(11.933,65.525)
DI1_IN: R99.1 X3.2 | length 12.1
  Top Layer w0.3: R99.1@25.757,74.851 R99.1@25.781,74.827 28.043,77.089 X3.2@28.043,86
DI1_LED: D4.1 U16.4 | length 42.5
  Top Layer w0.3: v1(2.762,60.865) 2.844,60.865 3.225,61.246 U16.4@4.945,61.246 ; v1(12.192,66.693) 12.241,66.742 21.403,66.742 22.987,68.326 22.987,75.438 23.698,76.149 D4.1@23.698,78.105
  Bottom Layer w0.3: v1(2.762,60.865) 2.762,60.946 2.54,61.168 2.54,68.25 3.505,69.215 7.366,69.215 8.703,67.878 9.685,67.878 10.888,66.675 12.174,66.675 v1(12.192,66.693)
DI2_IN: R100.1 X3.3 | length 13
  Top Layer w0.3: R100.1@20.066,74.827 22.352,77.113 22.352,83.809 X3.3@24.543,86
DI2_LED: D5.1 U16.6 | length 41
  Top Layer w0.3: v1(2.667,59.436) 2.748,59.436 3.558,60.246 U16.6@4.945,60.246 ; v1(11.938,67.843) 12.019,67.843 12.169,67.693 16.512,67.693 17.526,68.707 17.526,75.692 17.983,76.149 D5.1@17.983,78.105
  Bottom Layer w0.3: v1(2.667,59.436) 2.61,59.493 1.98,59.493 1.612,59.861 1.612,69.928 1.788,70.104 9.872,70.104 11.881,68.095 11.881,67.901 v1(11.938,67.843)
DI3_IN: R101.1 X3.4 | length 13.9
  Top Layer w0.3: R101.1@14.478,74.827 16.764,77.113 16.764,81.721 X3.4@21.043,86
DI3_LED: D6.1 U16.8 | length 36
  Top Layer w0.3: v1(2.413,57.658) 4.001,59.246 U16.8@4.945,59.246 ; v1(11.811,70.612) 11.811,70.693 12.268,71.15 D6.1@12.268,78.105
  Bottom Layer w0.3: v1(2.413,57.658) 2.362,57.658 0.762,59.258 0.762,70.612 1.27,71.12 11.303,71.12 v1(11.811,70.612)
DI_CS_N: R92.2 U3.16 U16.9 | length 95.5
  Top Layer w0.2: v1(5.08,57.15) 5.644,57.714 U16.9@5.644,58.547 ; R92.2@62.51,32.297 62.562,32.35 63.451,32.35 v1(63.486,32.314) ; v1@63.429,32.314 63.429,34.035 64.37,34.977 64.658,34.977 65.076,35.395 U3.16@65.786,35.395
  Bottom Layer w0.2: v1(5.08,57.15) 4.972,57.15 4.735,56.913 4.609,56.913 4.301,56.605 4.301,52.953 6.388,50.866 6.388,33.49 13.97,25.908 41.114,25.908 46.557,31.351 50.97,31.351 51.367,30.954 55.78,30.954 55.975,31.149 59.656,31.149 60.779,32.272 63.444,32.272 v1(63.486,32.314)
DI_READY_N: R93.2 U3.25 U16.15 | length 90.7
  Top Layer w0.2: v1(7.747,53.34) 9.525,55.118 9.525,56.876 8.644,57.757 U16.15@8.644,58.547 ; R93.2@68.389,29.466 68.389,30.29 v1(68.453,30.353) 68.453,31.03 68.854,31.43 68.854,31.897 68.561,32.19 68.561,32.62 U3.25@68.536,32.645
  Bottom Layer w0.2: v1(7.747,53.34) 7.112,52.705 7.112,44.021 12.81,38.323 12.81,37.888 12.177,37.255 12.177,36.551 13.295,35.433 17.78,35.433 20.955,32.258 60.305,32.258 60.886,32.839 63.704,32.839 63.762,32.78 64.011,32.531 64.011,30.172 64.128,30.055 65.95,30.055 66.604,30.709 67.5,30.709 67.853,30.356 68.45,30.356 v1(68.453,30.353)
DO1_CMD: R94.1 U3.20 U15.2 | length 22.2
  Top Layer w0.2: v1(55.118,27.051) 60.771,27.051 61.229,27.509 61.289,27.509 61.533,27.754 R94.1@61.533,27.813 ; R94.1@61.437,27.909 61.529,27.909 63.379,29.758 63.379,30.085 65,31.706 65,32.46 65.278,32.738 65.278,33.653 65.395,33.77 65.761,33.77 U3.20@65.786,33.795
  Top Layer w0.5: v1(51.054,25.781) 51.081,25.781 51.645,25.217 U15.2@53.677,25.217
  Bottom Layer w0.2: v1(51.054,25.781) 51.689,26.416 54.483,26.416 v1(55.118,27.051)
DO1_FAULT: MOSFET3.6 R110.2 U3.22 | length 38.9
  Top Layer w0.2: R110.2@64.135,26.862 64.14,26.867 64.14,27.317 v1(64.146,27.322) ; v1@64.135,27.322 64.135,27.919 64.415,28.199 64.415,28.284 64.723,28.592 64.835,28.592 65.786,29.543 65.786,30.803 66.351,31.368 66.743,31.368 67.336,31.961 U3.22@67.336,32.645
  Top Layer w0.5: MOSFET3.6@78.994,3.81 v1(80.264,3.81)
  Bottom Layer w0.5: v1(64.146,27.322) 64.146,23.453 80.264,7.335 v1(80.264,3.81)
DO1_OUT: C98.2 U17.13 U17.14 U17.15 U17.16 U17.17 U17.18 U17.19 U17.20 X4.1
DO2_CMD: R95.1 U3.21 U15.6 | length 15.8
  Top Layer w0.2: R95.1@62.738,26.862 62.526,27.074 62.526,28.119 62.643,28.236 63.456,28.236 63.757,28.537 63.898,28.537 65.422,30.06 65.422,30.899 66.216,31.693 66.609,31.693 66.936,32.02 U3.21@66.936,32.645
  Top Layer w0.3: U15.6@57.067,24.567 57.095,24.539 58.773,24.539 v1(58.801,24.511) ; v1(61.595,26.543) 61.914,26.862 R95.1@62.738,26.862
  Bottom Layer w0.3: v1(58.801,24.511) 59.69,24.511 60.05,24.871 60.05,26.031 60.562,26.543 v1(61.595,26.543)
DO2_FAULT: MOSFET4.6 R111.2 U3.23 | length 59.5
  Top Layer w0.2: v1(64.94,27.747) 64.984,27.747 65.366,28.129 65.47,28.129 ; R111.2@65.532,26.862 65.532,28.067 65.47,28.129 ; U3.23@67.736,32.645 67.736,31.901 66.878,31.043 66.485,31.043 66.229,30.787 66.229,29.526 65.47,28.767 65.47,28.129
  Top Layer w0.8: v1(36.663,4.559) 36.777,4.445 MOSFET4.6@39.878,4.445
  Bottom Layer w0.3: v1(36.663,4.559) 36.589,4.559 35.543,5.605 35.543,7.452 35.877,7.786 35.877,8.47 35.727,8.62 35.727,16.668 47.733,28.674 51.05,28.674 51.775,27.949 55.091,27.949 56.558,26.482 59.756,26.482 61.171,27.897 64.384,27.897 64.476,27.804 64.883,27.804 v1(64.94,27.747)
DO2_OUT: C93.2 U17.5 U17.6 U17.7 U17.8 U17.9 U17.10 U17.11 U17.12 X5.1
DO_ENABLE_REQ: R176.1 U3.8 U31.6 | length 12.3
  Top Layer w0.2: U31.6@56.94,41.077 58.725,41.077 59.155,40.648 59.155,38.63 59.569,38.216 59.657,38.216 59.784,38.089 60.395,38.089 61.098,37.386 61.098,37.27 R176.1@61.098,37.211 ; R176.1@61.155,37.27 62.601,37.27 63.497,38.166 64.002,38.67 64.975,38.67 65.131,38.67 65.181,38.62 65.761,38.62 U3.8@65.786,38.595
DO_SAFE_EN: R181.2 R183.2 U15.1 U15.5 | length 19
  Top Layer w0.3: v1(49.911,25.781) 49.917,25.787 49.917,27.299 R183.2@49.922,27.305 49.928,27.3 51.684,27.3 R181.2@51.689,27.294 ; R181.2@51.81,27.294 52.152,26.952 52.152,26.788 53.073,25.867 U15.1@53.677,25.867 ; U15.5@57.067,23.917 58.625,23.917 58.801,23.741 v1(58.801,22.987)
  Bottom Layer w0.3: v1(49.911,25.781) 51.019,24.673 51.019,24.292 52.07,23.241 55.88,23.241 56.515,22.606 57.427,22.606 57.808,22.987 v1(58.801,22.987)
EFUSE_RTN: C3.1 R1.1 R4.1 R5.2 R6.2 U1.15 U1.25 | length 20.2
  Top Layer w0.2: U1.25@15.753,30.075 16.253,29.575 U1.15@17.653,29.575 21.193,29.575 21.451,29.833 21.451,30.276 R1.1@21.655,30.48 ; R6.2@20.574,26.808 R6.2@20.649,26.883 ; R4.1@21.601,32.131 21.926,32.456 22.931,32.456 23.495,33.02 25.146,33.02 26.416,31.75 26.416,29.337 25.4,28.321 R5.2@21.728,28.321 R5.2@21.844,28.205
  other v2: 18.669,27.305 12.954,27.94 12.954,28.829 15.748,28.829 12.954,29.718 14.859,30.099 15.748,30.099 16.637,30.099 12.954,30.607 15.748,31.369 12.954,31.496
ETH_CS_N: R32.2 U3.2 U6.32 | length 58.4
  Top Layer w0.2: v1(61.341,43.434) 62.903,43.434 63.595,42.742 63.595,42.565 R32.2@63.649,42.511 ; R32.2@63.819,42.418 64.02,42.217 64.02,41.898 64.898,41.02 65.761,41.02 U3.2@65.786,40.995 ; v1(89.408,54.229) 91.186,52.451 92.89,52.451 v1(92.904,52.465) ; v1(100.838,57.277) 100.946,57.277 101.073,57.404 103.087,57.404 U6.32@103.099,57.416
  Bottom Layer w0.2: v1(61.341,43.434) 62.69,43.434 63.699,42.425 64.655,42.425 64.726,42.496 67.515,42.496 67.564,42.545 67.75,42.545 69.833,44.628 69.833,45.957 74.295,50.419 75.094,50.419 75.238,50.275 76.036,50.275 77.814,52.052 77.814,53.252 78.519,53.958 82.616,53.958 83.722,55.063 87.22,55.063 88.055,54.229 v1(89.408,54.229) ; v1(92.904,52.465) 93.415,52.976 94.251,52.976 94.598,53.323 94.598,54.552 96.886,56.84 100.401,56.84 v1(100.838,57.277)
ETH_INT_N: U3.6 U6.36 | length 56.6
  Top Layer w0.2: v1(63.119,38.99) 63.227,38.99 63.587,39.349 64.442,39.349 64.487,39.395 U3.6@65.786,39.395 ; v1(90.678,47.752) 90.678,47.778 91.16,48.26 92.583,48.26 v1(95.123,50.8)
  Top Layer w0.3: v1(102.362,54.102) 102.362,54.183 102.093,54.452 102.093,54.981 102.528,55.416 U6.36@103.099,55.416
  Bottom Layer w0.2: v1(63.119,38.99) 67.692,38.99 72.446,43.744 72.446,46.732 73.811,48.096 74.004,48.096 78.54,43.561 81.904,43.561 82.126,43.339 83.646,43.339 83.868,43.561 87.052,43.561 87.529,44.038 87.624,44.038 90.678,47.092 v1(90.678,47.752) ; v1(95.123,50.8) 96.837,52.514 100.774,52.514 v1(102.362,54.102)
ETH_MISO: U3.1 U6.34 | length 54
  Top Layer w0.2: v1(64.931,41.971) 65.506,41.395 U3.1@65.786,41.395 ; v1(89.569,49.657) 89.656,49.657 90.037,50.038 92.045,50.038 93.141,51.135 93.141,51.485 v1(93.218,51.562)
  Top Layer w0.3: v1(101.142,55.499) 102.06,56.416 U6.34@103.099,56.416
  Bottom Layer w0.2: v1(64.931,41.971) 67.86,41.971 71.288,45.399 71.288,46.215 71.471,46.398 71.471,47.135 74.264,49.929 76.004,49.929 77.377,48.556 79.539,48.556 81.909,46.186 81.909,44.935 82.53,44.314 83.242,44.314 83.465,44.536 85.34,44.536 85.817,45.013 87.22,45.013 89.45,47.243 89.45,49.34 89.492,49.382 89.492,49.58 v1(89.569,49.657) ; v1(93.218,51.562) 93.28,51.624 93.818,51.624 95.248,53.054 95.248,53.682 96.137,54.57 96.137,55.171 96.517,55.552 97.119,55.552 97.319,55.753 99.025,55.753 99.279,55.499 v1(101.142,55.499)
ETH_MOSI: U3.4 U6.35 | length 55.9
  Top Layer w0.2: v1(64.075,40.37) 64.874,40.37 64.999,40.245 65.366,40.245 65.391,40.22 65.761,40.22 U3.4@65.786,40.195 ; v1(90.551,48.641) 91.82,48.641 v1(94.306,51.127)
  Top Layer w0.3: v1(101.473,54.229) 101.49,54.246 101.49,54.979 101.724,55.213 101.724,55.445 102.185,55.906 103.088,55.906 U6.35@103.099,55.916
  Bottom Layer w0.2: v1(64.075,40.37) 64.091,40.386 68.58,40.386 72.121,43.927 72.121,46.866 73.676,48.421 74.139,48.421 75.724,46.836 78.186,46.836 78.511,46.511 79.414,46.511 82.261,43.664 83.512,43.664 83.734,43.886 86.918,43.886 87.395,44.363 87.49,44.363 90.1,46.973 90.1,48.19 v1(90.551,48.641)
  Bottom Layer w0.3: v1@94.205,51.228 96.512,53.535 96.512,55.016 96.673,55.177 98.812,55.177 99.76,54.229 v1(101.473,54.229)
ETH_RX_N: C52.2 J2.6 | length 21.7
  Top Layer w0.2: J2.6@113.157,32.766 114.135,32.766 114.252,32.883 114.252,33.607 115.601,34.956 115.601,44.547 120.348,49.294 120.348,50.191 120.231,50.308 120.197,50.308 119.872,50.633 C52.2@119.761,50.633
ETH_RX_P: C51.2 J2.4 | length 21.7
  Top Layer w0.2: J2.4@115.697,32.766 114.719,32.766 114.602,32.883 114.602,33.462 115.951,34.811 115.951,44.402 120.698,49.149 120.698,50.191 120.815,50.308 120.849,50.308 121.174,50.633 C51.2@121.285,50.633
ETH_SCK: U3.3 U6.33 | length 57
  Top Layer w0.2: v1(63.858,41.285) 63.902,41.285 64.292,40.895 64.492,40.695 65.009,40.695 65.109,40.595 U3.3@65.786,40.595 ; v1(90.551,49.513) 92.058,49.513 93.743,51.198 93.743,51.751 93.843,51.851 93.843,52.441 v1(93.853,52.451)
  Top Layer w0.3: v1(101.131,56.388) 101.164,56.388 101.678,56.902 102.028,56.902 102.032,56.906 103.088,56.906 U6.33@103.099,56.916
  Bottom Layer w0.2: v1(63.858,41.285) 63.875,41.302 64.458,41.302 64.558,41.402 65.679,41.402 65.933,41.148 67.496,41.148 71.796,45.448 71.796,47.001 74.399,49.604 75.869,49.604 77.242,48.231 79.223,48.231 80.591,46.863 80.772,46.863 81.584,46.051 81.584,44.8 82.395,43.989 83.377,43.989 83.599,44.211 85.598,44.211 86.075,44.688 87.355,44.688 89.775,47.108 89.775,49.015 89.892,49.132 90.083,49.132 90.464,49.513 v1(90.551,49.513) ; v1(93.853,52.451) 93.93,52.528 94.262,52.528 94.923,53.188 94.923,54.417 97.021,56.515 98.939,56.515 99.066,56.388 v1(101.131,56.388)
ETH_TX_N: J2.3 R48.2 R51.1 | length 25.2
  Top Layer w0.2: R51.1@113.919,51.497 113.778,51.497 113.528,51.247 113.513,51.247 113.396,51.13 113.396,50.251 113.513,50.134 115.849,50.134 115.967,50.251 115.967,50.504 115.779,50.692 v1(115.779,50.8) 115.822,50.8 115.967,50.945 115.967,52.908 115.849,53.025 115.834,53.025 115.584,53.275 R48.2@115.443,53.275
  Bottom Layer w0.2: v1(115.779,50.8) 115.779,50.692 115.967,50.504 115.967,43.072 118.062,40.976 118.062,35.423 117.945,35.306 J2.3@116.967,35.306
ETH_TX_P: J2.1 R41.2 R46.1 | length 26.4
  Top Layer w0.2: R46.1@112.522,51.497 112.663,51.497 112.913,51.247 112.928,51.247 113.046,51.13 113.046,50.106 113.368,49.784 115.994,49.784 116.317,50.106 116.317,50.504 116.504,50.692 v1(116.504,50.8) 116.461,50.8 116.317,50.945 116.317,52.908 116.434,53.025 116.449,53.025 116.699,53.275 R41.2@116.84,53.275
  Bottom Layer w0.2: v1(116.504,50.8) 116.504,50.692 116.317,50.504 116.317,43.217 118.412,41.121 118.412,35.423 118.529,35.306 J2.1@119.507,35.306
FLT1: R104.1 U17.21 | length 4.3
  Top Layer w0.6: U17.21@72.898,18.809 75.487,18.809 76.493,17.803 76.593,17.803 76.643,17.753 R104.1@76.643,17.653
FLT2: R105.1 U17.4 | length 18.4
  Top Layer w0.6: R105.1@53.213,5.78 53.313,5.78 53.363,5.83 53.363,5.93 54.356,6.923 54.356,8.763 58.801,13.208 58.801,16.256 61.333,18.788 63.225,18.788 U17.4@63.246,18.809
GND_RS485_ISO: C57.2 C58.1 C59.1 J4.3 U8.11 U8.13 U8.14 U8.15 U9.3 | length 52.1
  Top Layer w0.5: J4.3@95.377,86.106 95.377,82.042 98.933,78.486 100.015,78.486 100.372,78.843 ; C59.1@102.108,77.05 v1(102.108,78.359) 102.081,78.359 101.597,78.843 ; v1(108.077,73.152) C57.2@109.434,73.152 ; v1(108.077,74.422) U8.15@112.624,74.422 ; v1(108.077,75.504) 108.265,75.692 U8.14@112.624,75.692 ; v1(108.331,77.978) 108.585,78.232 C58.1@109.434,78.232 ; v1(108.331,79.756) 108.358,79.756 108.525,79.923 110.633,79.923 111.054,79.502 U8.11@112.624,79.502 ; v1(110.363,76.962) U8.13@112.624,76.962 ; 100.372,78.843 101.597,78.843 ; 100.372,78.843 101.597,78.843 ; 100.372,78.843 101.597,78.843 ; 100.372,78.843 101.597,78.843
  Bottom Layer w0.5: v1(102.108,78.359) 102.489,78.74 104.841,78.74 107.284,76.296 ; v1(108.077,73.152) v1(108.077,74.422) v1(108.077,75.504) 107.284,76.296 ; v1(108.331,79.756) 108.331,76.962 ; v1(110.363,76.962) 108.331,76.962 ; 107.284,76.296 107.95,76.962 108.331,76.962